# Altium PCB LTE GNSS Tracker.PcbDoc (part 5 of 5)
Units mil, origin at the board's own origin, x right, y up, seen from the top; angles counter-clockwise.
Board outline 2165.35 x 4361.93 mil, 4 copper layers (Top Layer, Layer 1, Layer 2, Bottom Layer), stack 38.189 mil thick; 158 components, 113 nets, 617 pads, 1197 vias.
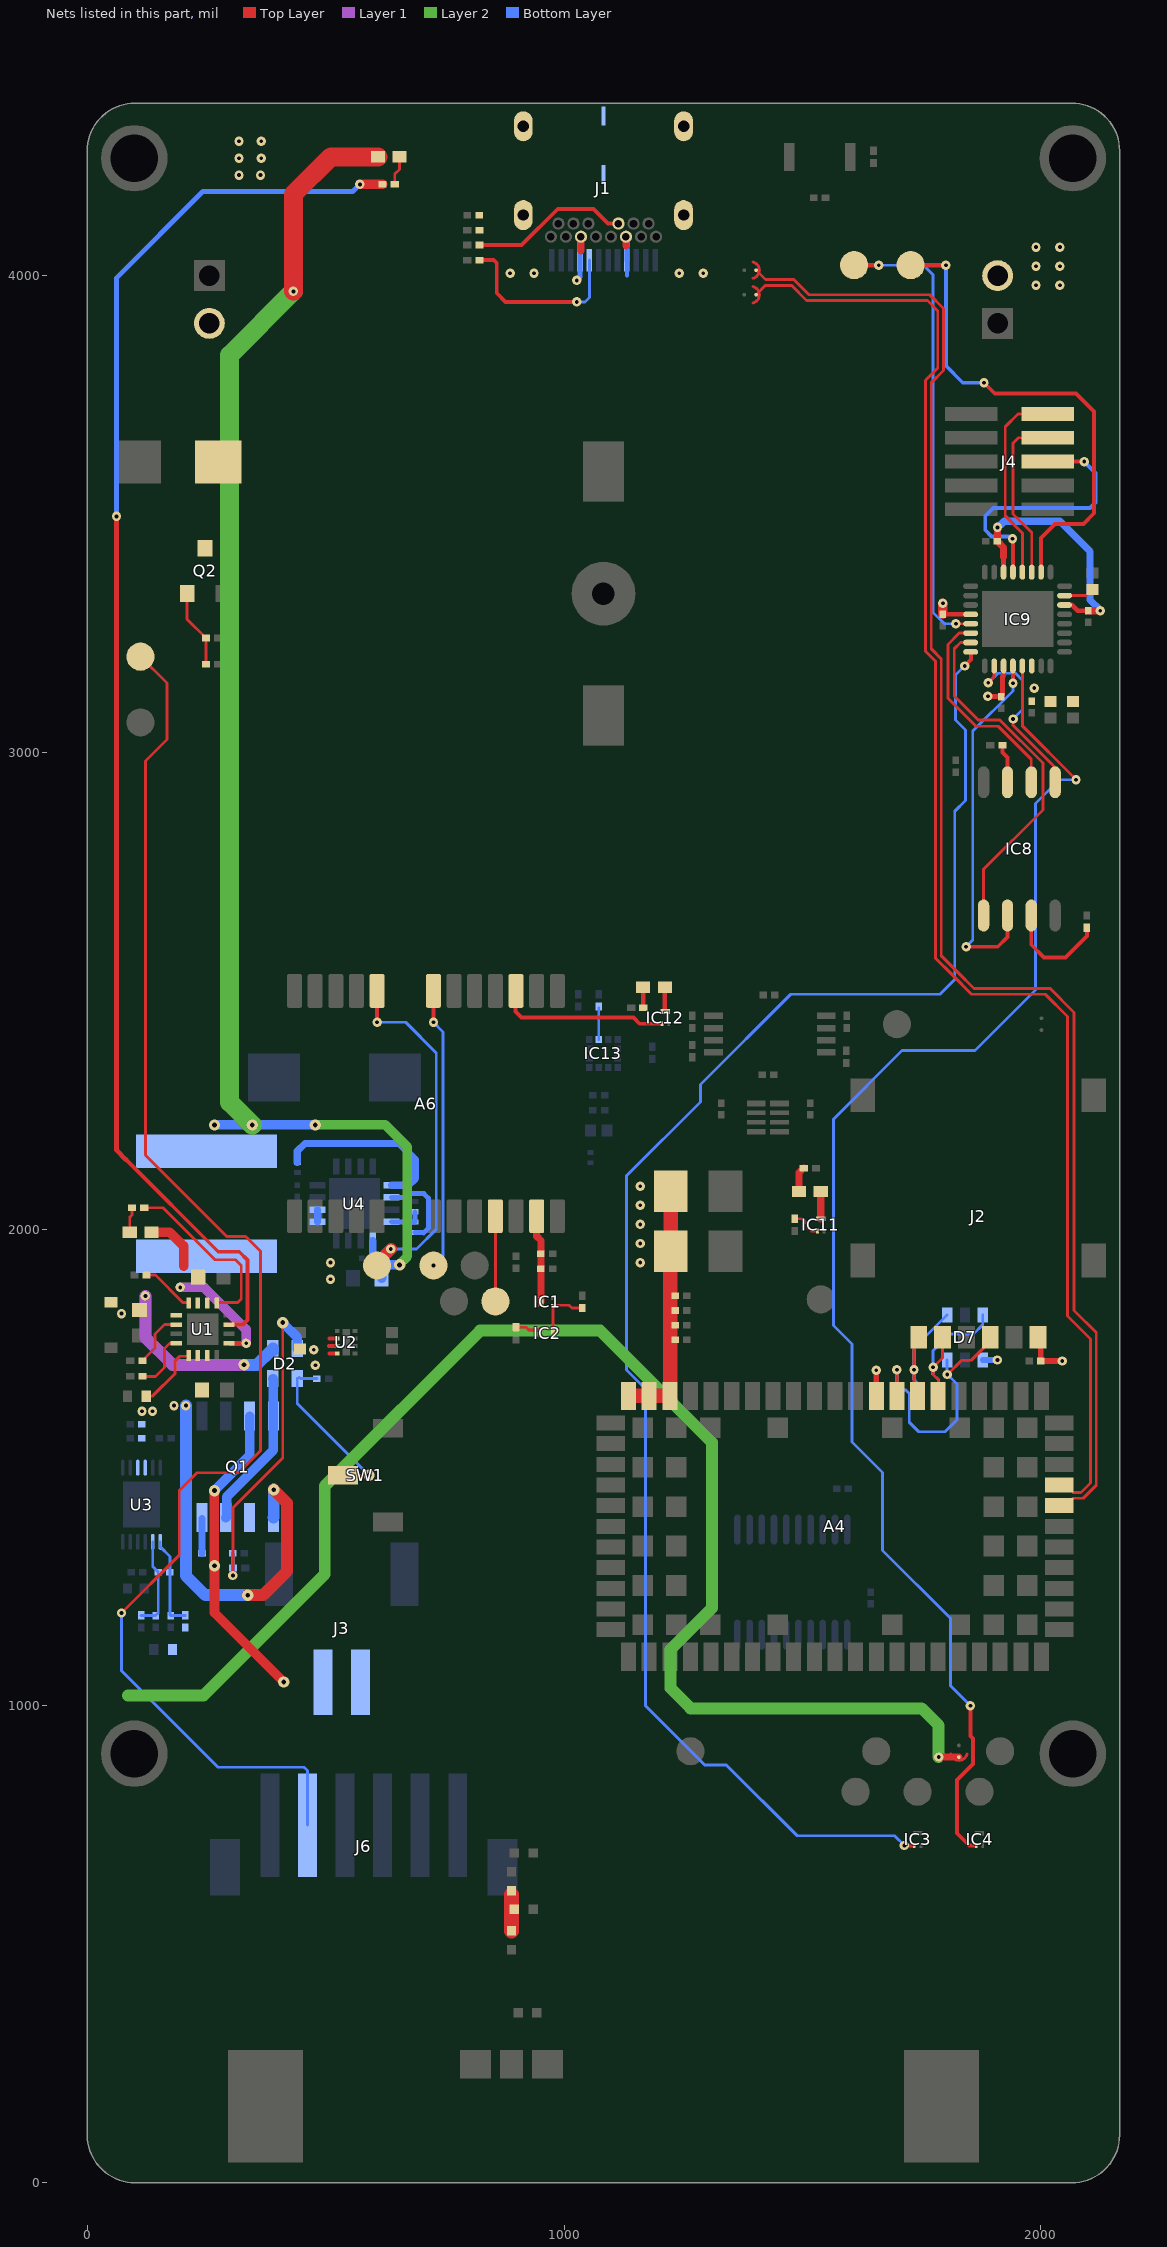
[diagram p5: the nets of this part, all layers, seen from the top]

## Via types
v1: diameter 19.68, hole 7.87, Top Layer to Bottom Layer, 1112 vias
v2: diameter 19.68, hole 7.87, Top Layer to Bottom Layer, tented both sides, 56 vias
v3: diameter 24, hole 10, Top Layer to Bottom Layer, 29 vias

## Nets (pads, with @x,y where several pads share a name; then routed paths per layer and width w, separated by ;. In a path a pad name is that pad's centre, name@x,y a point inside that pad or via, vN(x,y) a via of type N, cw(c..) or ccw(c..) an arc to the next point about the centre after c; other vN are vias at no path point) (continued)
NetA6_7: A6.7 TP14.1 | length 592.7
  Top Layer w6: A6.7@726.01,2499.74 A6.7@726.27,2499.47
  Top Layer w8: v2(726.27,2433.94) A6.7@726.27,2499.47
  Bottom Layer w6: v2(726.01,1923.88) 746.39,1944.26 746.39,2413.83 v2(726.27,2433.94)
NetA6_8: A6.8 TP7.1 | length 745.4
  Top Layer w8: v2(607.9,2433.94) A6.8@607.9,2499.73
  Top Layer w25: TP7.1@607.9,1923.88 607.9,1929.62 v2(636.64,1958.36)
  Bottom Layer w6: v2(607.9,2433.94) 667.96,2433.94 732.07,2369.83 732.07,1999.97 690.45,1958.36 v2(636.64,1958.36)
NetA6_21: A6.21 TP8.1 | length 178.8
  Top Layer w6: TP8.1@855.93,1848.51 A6.21@855.93,2027.29
NetC5_2: C5.2 J1.SH1 J1.SH2 J1.SH3 J1.SH4 R8.1
NetC6_2: C6.2 D2.4 R10.2 | length 688.6
  Top Layer w6: v1(305.43,1273.73) 305.43,1415.56 409.92,1520.05 v3(409.92,1804.05)
  Bottom Layer w6: C6.2@305.14,1320.27 305.34,1320.07 305.34,1289.45 305.49,1289.31 305.49,1273.79 v1(305.43,1273.73)
  Bottom Layer w20: v3@411,1804.05 v3(409.92,1804.05) 409.92,1803.15 440.62,1772.44 440.62,1750.09 D2.4@440.26,1749.73
NetC7_2: C7.2 D2.1 SW1.2 | length 359.6
  Top Layer w6: SW1.2@534.67,1483.8 v3(590.93,1483.8)
  Bottom Layer w6: D2.1@440.26,1686.73 440.26,1634.48 v3(590.93,1483.8) ; D2.1@444.58,1689.14 447.09,1686.63 C7.2@481.53,1686.63
NetC16_2: C16.2 C49.1 R17.1 | length 76.9
  Top Layer w31.5: C49.1@889.76,528.18 889.76,604.76 R17.1@890,605
NetC19_2: C19.2 C21.2 R32.1 U3.7 | length 194.8
  Bottom Layer w6: U3.7@153.12,1344.3 153.12,1333.74 173.31,1313.55 C21.2@173.36,1280.74 173.31,1190.89 C19.2@174.83,1189.39 175.43,1189.95 R32.1@205.5,1189.95
NetC21_1: C21.1 C22.1 R33.1 U3.8 | length 192.6
  Bottom Layer w6: R33.1@112.8,1189.95 113.3,1189.45 143.16,1189.45 148.9,1195.19 148.9,1280.71 137.37,1292.24 U3.8@137.37,1344.3
NetC38_1: C38.1 IC9.23 | length 63.6
  Top Layer w6: IC9.23@2049.82,3328.95 2095.14,3328.95 C38.1@2108.1,3341.91
NetD1_2: D1.2 R5.2 | length 53.5
  Top Layer w6: D1.2@88.98,1993.44 88.98,2025.03 93.96,2030.01 R5.2@93.96,2044.9
NetD2_2: D2.2 Q1.4 Q1.7 Q1.8 R9.1 | length 406.1
  Bottom Layer w15: R9.1@240.37,1320.27 240.57,1320.42 Q1.8@240.57,1392.72
  Bottom Layer w20: Q1.7@290.43,1395.17 292.24,1396.98 292.24,1438.61 390.43,1536.8 Q1.4@390.43,1607.77 389.75,1608.45 389.75,1686.06 D2.2@389.07,1686.73
NetD3_A: D3.A J5.2 J7.2 Q2.3
  other v1: 1990,3980 2040,3980 1990,4020 2040,4020 1990,4060 2040,4060 318.26,4211 363.26,4211 318.26,4246.5 365,4246.5 318.26,4282 365,4282
NetD4_2: D4.2 R2.2 | length 61.9
  Top Layer w6: R2.2@644.89,4191.45 644.89,4213.05 654.65,4222.81 D4.2@654.69,4249.25
NetD8_1: D8.1 R25.2 | length 53.3
  Top Layer w15: D8.1@1493.13,2079.14 1493.13,2118.75 1502.42,2128.04 R25.2@1502.97,2128.04
NetD8_2: D8.2 IC11.D | length 57.3
  Top Layer w15: IC11.D@1538.41,2021.89 D8.2@1538.41,2079.14
NetD9_1: D9.1 R26.2 | length 43.4
  Top Layer w6: R26.2@1166.05,2464.69 R26.2@1166.39,2464.35
  Top Layer w10: R26.2@1166.05,2464.69 D9.1@1166.02,2507.6
NetD9_2: D9.2 IC12.D | length 51.6
  Top Layer w6: IC12.D@1211.32,2457.7 IC12.D@1212.6,2456.54
  Top Layer w10: IC12.D@1211.32,2457.7 D9.2@1211.32,2507.56
NetIC1_G: IC1.G IC2.D R18.1 | length 122.3
  Top Layer w6: IC2.D@977.12,1781.38 IC1.G@977.12,1840.59 1010.6,1840.59 1016.5,1834.68 R18.1@1037.77,1834.68
NetIC2_G: IC2.G R34.2 | length 54.7
  Top Layer w6: R34.2@899.24,1794.18 919.87,1794.18 925.77,1788.27 IC2.G@951.53,1788.27
NetIC3_G: IC3.G IC9.8 | length 3412.2
  Top Layer w6: IC9.8@1852.97,3210.84 1852.97,3209 IC9.8@1853.82,3208.15
  Top Layer w8: v2(1713.89,707.2) IC3.G@1734.6,707.2 ; v2(1840.23,3181.31) 1853.82,3194.9 IC9.8@1853.82,3208.15
  Bottom Layer w6: v2(1713.89,707.2) 1693.3,727.79 1489.01,727.79 1341.02,875.78 1295.45,875.78 1170.99,1000.25 1170.99,1664.67 1131.22,1704.44 1131.22,2112.24 1285.86,2266.87 1285.86,2303.2 1475.46,2492.8 1788.36,2492.8 1819.56,2524 1819.56,2876.68 1841.85,2898.96 1841.85,3047.29 1821.16,3067.98 1821.16,3162.23 v2(1840.23,3181.31)
NetIC4_G: IC4.G IC9.13 | length 3001.7
  Top Layer w6: IC9.13@1961.24,3181.31 1961.24,3056 2073.84,2943.4 v1(2073.84,2942.66)
  Top Layer w8: v2(1852.35,1000.5) 1852.35,936.98 1857.47,931.86 1857.47,878.01 1824.21,844.74 1824.21,732.84 1849.84,707.2 IC4.G@1864.52,707.2
  Bottom Layer w6: v2(1852.35,1000.5) 1810.4,1042.45 1810.4,1183.83 1668.04,1326.19 1668.04,1489.74 1604,1553.78 1604,1759.12 1565,1798.12 1565,2230.58 1709.06,2374.65 1861.77,2374.65 1988.94,2501.82 1988.94,2892.74 2038.86,2942.66 v1(2073.84,2942.66)
NetIC8_3: IC8.3 R23.1 | length 224.9
  Top Layer w8: IC8.3@1980.1,2657.94 1980.09,2596.76 2006.85,2570 2051.85,2570 2096.8,2614.95 R23.1@2096.8,2632.25
NetIC8_7: IC8.7 R22.1 | length 81.8
  Top Layer w8: R22.1@1919.55,3014.9 1919.55,3000.01 1930.09,2989.47 IC8.7@1930.1,2937.47
NetIC9_5: IC9.5 TP12.1 | length 971.2
  Top Layer w6: TP12.1@1608.43,4022.03 TP12.1@1608.43,4022.03 ; v2@1660.25,4021.96 v2(1660.32,4021.89) ; v2@1821.88,3269.86 IC9.5@1852.97,3269.89
  Top Layer w10: TP12.1@1608.43,4022.03 v2@1660.25,4021.96
  Bottom Layer w6: v2(1660.32,4021.89) 1754.2,4021.89 1774,4002.1 1774,3293.6 1797.77,3269.82 v2(1821.85,3269.82)
NetIC9_26: IC9.26 TP13.1 | length 1053.5
  Top Layer w8: v2(1880.85,3775.51) 1903.46,3752.89 2074.02,3752.89 2111.77,3715.14 2111.77,3501.6 2089.6,3479.43 2029.92,3479.43 2000.61,3450.12 IC9.26@2000.61,3378.16
  Top Layer w10: TP13.1@1726.95,4022.03 v2(1800.87,4022.03)
  Bottom Layer w8: v2(1800.87,4022.03) 1800.87,3810.98 1836.34,3775.51 v2(1880.85,3775.51)
NetIC11_G: IC11.G R31.2 | length 62.2
  Top Layer w6: R31.2@1484,2021.89 1499.29,2021.89 1511.14,2010.04 1511.14,2003.07 1517.92,1996.3 IC11.G@1531.52,1996.3
NetIC13_2: IC13.2 R27.1 | length 66.2
  Bottom Layer w6: IC13.2@1072.83,2398.03 1072.83,2464.18 R27.1@1072.9,2464.25
NetJ1_A5: J1.A5 R4.1 | length 386.3
  Top Layer w8: R4.1@822.4,4032.6 852.4,4032.6 859,4026 859,3963 877,3945 v1(1026.85,3945)
  Bottom Layer w6: v1(1026.85,3945) 1044.24,3945 1053.15,3953.91 J1.A5@1053.15,4032.6
NetJ1_B5: J1.B5 R6.1 | length 335.8
  Top Layer w8: R6.1@822.4,4064.33 911.1,4064.25 986.85,4140 1061.86,4140 1092.49,4109.37 J1.B5@1114.17,4109.37
NetL1_2: L1.2 U4.3 U4.4 | length 25.6
  Bottom Layer w15: U4.4@482.62,2015.49 U4.3@482.62,2041.08
NetQ2_1: Q2.1 R13.1 R14.2 | length 172.9
  Top Layer w6: Q2.1@209.45,3341.5 209.45,3279.51 R14.2@249.01,3239.95 249.01,3237.84 249.1,3237.75 R13.1@249.1,3185.05
NetR1_1: R1.1 U1.14 | length 118.2
  Top Layer w6: R1.1@115.8,1724.45 141.85,1750.5 141.85,1780 161.74,1799.89 U1.14@185.47,1799.89
NetR2_1: R2.1 U1.7 | length 3005.5
  Top Layer w8: 81.08,2146.01 274.57,1952.52 318.7,1952.52 336.14,1935.08 336.14,1809.3 326.74,1799.89 U1.7@298.46,1799.89
  Top Layer w10: v1(61.38,3495) 61.38,2165.72 81.08,2146.01
  Top Layer w20: v1(571.85,4191.45) R2.1@619.3,4191.45
  Bottom Layer w10: v1@61.38,3496 61.38,3995.44 242.49,4176.56 556.95,4176.56 v1(571.85,4191.45)
NetR3_2: R3.2 U1.12 | length 111.7
  Top Layer w6: R3.2@124.49,1903.95 142.89,1903.95 200.3,1846.54 U1.12@212.44,1846.54
NetR5_1: R5.1 U1.9 | length 377.8
  Top Layer w6: R5.1@119.55,2044.9 158.81,2044.9 267.78,1935.93 310.68,1935.93 322.85,1923.77 322.85,1853.75 315.64,1846.54 U1.9@271.49,1846.54
NetR7_1: R7.1 U1.16 | length 121.8
  Top Layer w6: R7.1@115.8,1691.24 143,1691.15 161.85,1710 161.85,1750 172.37,1760.52 U1.16@185.47,1760.52
NetR11_1: R11.1 R12.1 U4.9 | length 70.9
  Bottom Layer w10: U4.9@638.13,2015.49 638.44,2015.18 686.83,2015.18 R11.1@687.14,2014.87 R12.1@687.14,2036.54
NetR35_2: R35.2 U4.12 | length 387.5
  Bottom Layer w15: R35.2@440.49,2140.21 440.49,2163.85 456.66,2180.02 654.21,2180.02 687.81,2146.42 687.81,2105.97 673.97,2092.12 638.27,2092.12 U4.12@638.13,2092.26
NetRth_1: Rth.1 U1.1 | length 139
  Top Layer w6: Rth.1@123.8,1649.56 136.4,1649.56 184.34,1697.5 184.34,1724 193.89,1733.55 U1.1@212.44,1733.55
RESET: J6.2 TP2.1 | length 3054.4
  Top Layer w6: v1(71.85,1195) 193,1316.15 193,1452.17 230.07,1489.24 317.03,1489.24 362.96,1535.17 362.96,1953.7 332.18,1984.48 292.62,1984.48 121.85,2155.25 121.85,2981.85 166.85,3026.85 166.85,3145.44 TP2.1@111.53,3200.79
  Bottom Layer w6: v1(71.85,1195) 71.85,1073.74 274.07,871.52 454.82,871.52 461.89,864.45 J6.2@461.89,750
SIM_CLK: A4.38 C48.2 D7.6 J2.C3 | length 369.7
  Top Layer w6: A4.38@1784.8,1650.37 1784.8,1684.39 1774,1695.19 v1(1774,1710.19) 1793.91,1730.1 J2.C3@1793.91,1772.88
  Bottom Layer w6: C48.2@1784.79,1662.55 1784.79,1684.4 1774,1695.19 v1(1774,1710.19) 1774,1745.19 1809,1780.19 1858.99,1780.19 1878.27,1799.47 D7.6@1878.27,1820.11
SIM_IO: A4.39 C47.2 D7.4 J2.C7 | length 319.1
  Top Layer w6: A4.39@1741.49,1650.37 1734,1657.87 v1(1734,1705.19) 1734,1762.97 J2.C7@1743.91,1772.88
  Bottom Layer w6: C47.2@1741.49,1662.55 1741.49,1677.71 1734,1685.2 v1(1734,1705.19) 1734,1750.64 D7.4@1803.47,1820.11
SIM_RST: A4.40 C46.2 D7.3 J2.C2 | length 565.5
  Top Layer w6: A4.40@1698.19,1650.37 v1(1698.18,1705.19) ; v1(1804,1695.19) 1834,1725.19 1854,1725.19 1893.91,1765.1 J2.C2@1893.91,1772.88
  Bottom Layer w6: v1(1698.18,1705.19) 1698.19,1662.55 1716.64,1662.55 1724,1655.19 1724,1595.19 1744,1575.19 1799,1575.19 1824,1600.19 1824,1675.19 v1(1804,1695.19) 1803.47,1695.72 D7.3@1803.47,1725.62
SPI_CLK: IC8.6 IC9.6 | length 446.5
  Top Layer w6: IC9.6@1852.97,3250.21 1829.06,3250.21 1805.23,3226.38 1805.23,3113.62 1863.85,3055 1910.84,3055 1980.09,2985.75 IC8.6@1980.1,2937.47
SPI_CS_FLASH: IC8.1 IC9.7 | length 754.3
  Top Layer w6: IC9.7@1852.97,3230.52 1831.64,3230.52 1818.5,3217.38 1818.5,3118.1 1868.6,3068 1913.85,3068 2004.35,2977.5 2004.35,2879.26 1880.09,2755 IC8.1@1880.1,2657.94
SPI_MISO: IC8.2 IC9.12 | length 769.6
  Top Layer w8: v1(1843.32,2592.57) 1909.64,2592.57 1930.09,2613.02 IC8.2@1930.1,2657.94 ; v1(1941.55,3145) IC9.12@1941.55,3181.31
  Bottom Layer w6: v1(1843.32,2592.57) 1857.18,2606.44 1857.18,3044.72 1941.55,3129.09 v1(1941.55,3145)
SPI_MOSI: IC8.5 IC9.10 | length 385.6
  Top Layer w6: v1(1889.59,3146) 1902.18,3158.59 IC9.10@1902.18,3181.31 ; v1(1941.85,3070) 1941.85,3057 2030.09,2968.76 IC8.5@2030.1,2937.47
  Bottom Layer w6: v1(1889.59,3146) 1909.59,3166 1946.85,3166 1961.85,3151 1961.85,3090 v1(1941.85,3070)
SWCLK: IC9.27 J4.4 | length 363.7
  Top Layer w6: IC9.27@1980.92,3378.16 1980.92,3461.32 1941.85,3500.4 1941.85,3648.4 1953.44,3660 J4.4@2014.3,3660
SWDIO: IC9.28 J4.2 | length 419.9
  Top Layer w6: IC9.28@1961.24,3378.16 1961.24,3460.34 1925.28,3496.3 1925.28,3682.99 1952.29,3710 J4.2@2014.3,3710
SWO: IC9.29 J4.6 | length 579.3
  Top Layer w8: IC9.29@1941.55,3378.16 v2@1941.55,3448.44 ; J4.6@2014.3,3610 v2(2090.9,3610)
  Bottom Layer w8: v2(1940.55,3448.44) 1937.39,3448.44 1932.64,3453.19 1896.81,3453.19 1883.5,3466.5 1883.5,3495.85 1900.22,3512.56 2102.95,3512.56 2114.7,3524.32 2114.7,3586.2 v2(2090.9,3610)
TIMEPULSE: A6.3 IC12.G | length 361.8
  Top Layer w8: A6.3@899.24,2499.74 898.2,2498.7 898.2,2456.36 910.82,2443.74 1145.8,2443.74 1158.6,2430.95 IC12.G@1205.71,2430.95
USB_N: A4.28 SB3.2 | length 3237.2
  Top Layer w6: SB3.2@1403.79,4011.48 1403.79,4010.71 1422.76,3991.74 1481.83,3991.74 1513.57,3960 1766.97,3960 1795.95,3931.02 1795.95,3801.35 1770.1,3775.51 1770.1,3217.31 1791.2,3196.22 1791.2,2573.36 1826.79,2537.76 1859.76,2504.8 1878.55,2504.8 1880.09,2504.8 1971.75,2504.8 2019.9,2504.8 2069.96,2454.74 2069.96,1829.34 2116.2,1783.09 2116.2,1462.84 2089.08,1435.71 2068.17,1435.71 2052.52,1420.06 A4.28@2038.74,1420.06
USB_P: A4.29 SB2.2 | length 3194.2
  Top Layer w6: SB2.2@1403.79,3960 1403.79,3960.77 1422.76,3979.74 1476.86,3979.74 1508.6,3948 1762,3948 1783.95,3926.05 1783.95,3806.32 1758.1,3780.48 1758.1,3212.34 1779.2,3191.25 1779.2,2568.39 1814.07,2533.52 1854.79,2492.8 1878.55,2492.8 1880.09,2492.8 1971.75,2492.8 2009.47,2492.8 2056.01,2446.25 2056.01,1818.03 2104.2,1769.84 2104.2,1467.81 2084.11,1447.71 2068.17,1447.71 2052.52,1463.37 A4.29@2038.74,1463.37
V_GPS: A6.23 C54.2 C55.2 IC1.D | length 183.5
  Top Layer w15: A6.23@942.55,2027.29 942.55,1985 951.53,1976.02 C55.2@951.53,1948.13 C54.2@951.53,1917.05 IC1.D@951.53,1847.48
VBATT: C3.2 C17.2 C18.2 Q1.5 Q1.6 U1.2 U1.3 U3.3 U3.4 | length 848.3
  Top Layer w25: v3(336.79,1232.29) 368.59,1232.29 419.29,1282.98 419.29,1425.44 v3(391.06,1453.67)
  Bottom Layer w25: v1(206.85,1630) 206.85,1273.26 247.82,1232.29 v3(336.79,1232.29) ; Q1.5@390.43,1395.17 391.06,1395.8 v3(391.06,1453.67)
  other v1: 114.85,1618 136.85,1618 181.85,1630
VBATT+: J3.1 Q1.3 R9.2 | length 807
  Top Layer w20: v3@264.8,1294.07 265.87,1295.13 265.87,1451.73 266.33,1451.26 266.33,1294.53 v3(266.8,1294.07) 266.8,1195.56 v3(412.18,1050.19)
  Bottom Layer w10: R9.2@265.96,1320.27 R9.2@266.16,1320.42
  Bottom Layer w20: v3(266.8,1451.73) 340.43,1525.36 Q1.3@340.43,1607.77
VBATT-: J3.2 R16.2 R32.2
VBUS: C1.2 D2.3 D5.1 J1.A4 J1.A9 J1.B4 J1.B9 SB1.1 U1.13 | length 3625.6
  Top Layer w15: 1035.43,4051.42 J1.B9@1035.43,4081.81 ; 1129.92,4061.93 J1.B4@1129.92,4081.81 ; v2(1785.82,893) 1786.19,892.63 1814.2,892.63 SB1.1@1828.11,892.63
  Layer 1 w25: v1(121.85,1860) 121.85,1772.84 179.15,1715.54 v3(328.7,1715.54)
  Layer 2 w25: 84.97,1022 243.84,1022 498.06,1276.22 498.06,1461.33 823.93,1787.21 1075.85,1787.21 1310,1553.06 1310,1205.29 1223.5,1118.8 1223.5,1037.11 1265.62,995 1750,995 1785.82,959.18 v2(1785.82,893)
  Bottom Layer w8: 1131.85,4000 1131.89,4000.04 J1.A9@1131.89,4032.6
  Bottom Layer w10: v1(1026.85,3990) 1033.46,3996.61 J1.A4@1033.46,4032.6
  Bottom Layer w11: J1.A4@1033.46,4032.6 1033.46,4079.84 J1.B9@1035.43,4081.81 ; J1.B4@1129.92,4081.81 1131.89,4079.84 J1.A9@1131.89,4032.6
  Bottom Layer w25: v3(328.7,1715.54) 355.74,1715.54 384.71,1744.51 388.39,1744.51 389.07,1745.2 D2.3@389.07,1749.73
  other v1: 71.85,1823 886.85,4005 936.85,4005 1241.85,4005 1291.85,4005
VMCU: C31.2 C32.2 C33.2 C34.2 C35.2 C36.2 FB1.2 IC9.4 IC9.11 IC9.14 IC9.22 IC9.30 | length 712.8
  Top Layer w10: C32.2@1794.63,3289.76 1794.72,3289.67 1852.88,3289.67 IC9.4@1852.97,3289.58 ; v1(1889.08,3117.76) 1889.59,3117.26 1915.87,3117.26 C36.2@1918.75,3120.13 ; C36.2@1919.85,3120.25 1919.85,3159.01 1921.87,3161.03 IC9.11@1921.87,3181.31 ; IC9.30@1921.87,3378.16 1921.87,3409.67 ; IC9.22@2049.82,3309.26 2064.85,3309.26 2076.98,3297.13 C34.2@2099.85,3297.13
  Top Layer w15: v2(1909.05,3472.03) 1909.05,3442.94 1921.87,3430.12 1921.87,3409.67 ; C34.2@2099.85,3297.13 v1(2124.5,3297.07) v1(2124.5,3297.07)
  Top Layer w20: C32.2@1794.63,3289.76 v1(1794.63,3313.01)
  Bottom Layer w15: v2(1909.05,3472.03) 1910.32,3472.03 1915.75,3477.46 1916.05,3477.46 1923.43,3484.84 2040.38,3484.84 2103.43,3421.8 2103.43,3319.42 2124.5,3298.34 v1(2124.5,3297.07)
  other v1: 1986,3135
VSIM: A4.41 C44.2 C45.2 D7.1 J2.C1 | length 223.5
  Top Layer w12: A4.41@1654.88,1650.37 v1(1654.87,1704.32) ; J2.C1@1993.91,1772.88 1999.76,1767.03 C44.2@1999.76,1723.48 v2(2045.02,1723.48)
  Bottom Layer w8: C45.2@1654.89,1662.55 v1(1654.87,1704.32)
  Bottom Layer w12: D7.1@1878.27,1725.62 v1(1909,1725.62)
VSYS: A4.51 A4.52 A4.53 C2.2 C10.2 C11.2 C12.2 C40.2 C41.2 C42.1 C43.1 C50.2 C51.2 D1.1 D4.1 L1.1 R11.2 U1.5 U1.10 U1.11 U2.6 U2.7 U2.8 U4.8 U4.11 | length 4103.5
  Top Layer w8: 506.93,1754.92 U2.7@524.28,1754.92 ; 507.52,1770.67 U2.6@524.28,1770.67 ; 507.68,1739.17 U2.8@524.28,1739.17
  Top Layer w10: U1.5@298.46,1760.52 298.58,1760.4 v1@333.27,1760.4
  Top Layer w20: D1.1@134.25,1993.44 173.4,1993.44 201.85,1965 201.85,1922
  Top Layer w30: A4.53@1135.19,1650.37 A4.52@1178.5,1650.37 A4.51@1221.81,1650.37 1222.56,1651.12 1222.56,1952.52 C43.1@1223.69,1953.66 C42.1@1223.69,2079.64
  Top Layer w40: v1@432.33,3967.6 432.33,4170.48 511.16,4249.31 D4.1@609.38,4249.31
  Layer 1 w20: v1(194.77,1877.91) 245.06,1877.91 333.27,1789.69 v1(333.27,1760.79)
  Layer 2 w20: v3(477.92,2218.59) 625.3,2218.59 671.32,2172.58 671.32,1942.98 v3@653.33,1925 ; v3@652.92,1924.58 v3@653.33,1925 ; v3(655,1925) v3@653.33,1925
  Layer 2 w40: v3(346.04,2218.59) 298.46,2266.17 298.46,3833.26 v1@432.33,3967.13
  Bottom Layer w10: U4.11@638.13,2066.67 665.27,2066.67 673.22,2074.62 706.08,2074.62 715.51,2065.19 715.51,2001.81 705.88,1992.18 705.16,1992.9 687.46,1992.9 R11.2@687.14,1993.22
  Bottom Layer w15: C11.2@598.76,1939.58 U4.8@598.76,1976.12
  Bottom Layer w20: v3(266.85,2218.59) v3(346.04,2218.59) v3(477.92,2218.59) v3@479.59,2218.59 ; C10.2@617.14,1896.9 C10.2@617.14,1899.4 ; 618.59,1925 v3(655,1925)
  other v1: 478.5,1714.68 475,1747 510,1895 510,1930 432.33,3967
  other v2: 1160,1930 1160,1970 1160,2010 1160,2050 1160,2090
pads on no net: A4.2 A4.31 A4.34 A4.35 A4.36 A4.37 A4.44 A4.45 A4.46 A4.47 A4.48 A4.49 A4.62 A5.0 A6.1 A6.2 A6.4 A6.9 A6.14 A6.15 A6.16 A6.17 IC9.19 IC9.20 IC9.21 IC13.7 IC13.11 J1.A2 J1.A3 J1.A8 J1.A10 J1.A11 J1.B2 J1.B3 J1.B8 J1.B10 J1.B11 J2.C6 J2.SW J3.P1 J3.P2 J4.3 J4.7 J4.8 J6.P1 J6.P2 SW1.1 U2.3 U3.1 U3.12 U4.2 U4.14 U5.3 U5.6
copper on no net: | length 12882.9
  Top Layer w10: 0,100 ccw(c100,100) 100,0 2065.35,0 ccw(c2065.35,100) 2165.35,100 2165.35,4261.93 ccw(c2065.35,4261.93) 2065.35,4361.93 100,4361.93 ccw(c100,4261.93) 0,4261.93 0,100
  other v1: 607.9,2558.95

## Polygon pours and split planes (outlines as drawn)
GND on Top Layer "TOP-GND 2" (solid, remove dead copper, pour order 272): 2145.25,511.06 2145.25,4265.55 2144.94,4272.51 2144.03,4279.42 2142.52,4286.23 2140.43,4292.88 2137.76,4299.32 2134.54,4305.5 2130.8,4311.38 2126.55,4316.91 2121.84,4322.05 2116.7,4326.76 2111.17,4331 2105.3,4334.74 2099.11,4337.96 2092.67,4340.63 2086.03,4342.73 2079.22,4344.23 2072.31,4345.14 2065.35,4345.45 1281.85,4345.45 1281.85,4113.62 1271.85,4103.62 911.85,4103.62 881.85,4133.62 881.85,4345.45 100,4345.45 93.03,4345.14 86.12,4344.23 79.32,4342.73 72.67,4340.63 66.23,4337.96 60.05,4334.74 54.17,4331 48.64,4326.76 43.5,4322.05 38.79,4316.91 34.55,4311.38 30.8,4305.5 27.58,4299.32 24.91,4292.88 22.82,4286.23 21.31,4279.42 20.4,4272.51 20.1,4265.55 20.1,511.06
VSYS on Top Layer "TOP-VSYS" (solid, pour order 144): 256.85,1830 256.85,1880 250.05,1886.79 250.05,1927.48 234.75,1942.78 195.97,1942.78 186.85,1933.66 186.85,1882.32 226.85,1863.63 226.85,1830
NetD3_A on Top Layer "TOP-NETD3_A" (solid, pour order 152): 1860,3960 2090,3960 2090,4130 2070,4150 1860,4150
VSYS on Top Layer "VSYS_L01" (solid, pour order 108): 1250,2120 1130,2120 1110,2100 1110,1930 1130,1910 1250,1910
GND on Top Layer "TOP-GND" (solid, pour order 114): 846.35,511.45 846.35,554.64 302.03,554.64 301.42,553.68 300.64,552.65 299.77,551.69 298.82,550.81 297.79,550.01 296.7,549.31 295.56,548.71 294.36,548.2 293.13,547.81 291.86,547.52 290.58,547.34 289.28,547.28 287.99,547.33 286.7,547.49 285.44,547.77 284.2,548.15 283,548.64 281.84,549.23 280.75,549.92 279.71,550.7 278.75,551.58 277.87,552.53 277.08,553.55 276.37,554.64 191.69,554.64 191.69,511.45 781.7,511.45 781.7,274.97 781.7,219.04 846.35,219.04
NetD3_A on Top Layer "TOP-+5V0 1" (solid, pour order 150): 300,3950 290,3940 220,3940 210,3930 210,3550 180,3520 180,3420 200,3400 360,3400 380,3420 380,4295 300,4295
GND on Top Layer "TOP-GND 1" (solid, pour order 126): 933.09,554.25 1971.98,554.25 1971.98,511.06 998.09,511.06 998.09,219.12 933.09,219.12
+5V0 on Top Layer "TOP-NETD3_A 1" (solid, pour order 268): 50,4030 70,4050 280,4050 290,4040 290,3970 280,3960 210,3960 190,3940 190,3560 170,3540 68.88,3540 50,3561.26
+5V0 on Top Layer "TOP-+5V0" (solid, pour order 148): 2070,3780 1880,3780 1860.7,3799.3 1860.7,3940 2090,3940 2090,3800
VSYS on Top Layer "TOP-VSYS 1" (solid, pour order 146): 406.85,1705 521.85,1705 526.85,1710 526.85,1770 521.85,1775 491.85,1775 476.85,1760 406.85,1760 401.85,1755 401.85,1710 406.85,1705
VBUS on Top Layer "TOP-VBUS 2" (solid, pour order 142): 1140,4085 1140,4065 1150,4055 1285,4055 1305,4035 1305,3995 1285,3975 1246.85,3975 1130,3975 1120,3985 1120,4085
VBUS on Top Layer "TOP-VBUS 1" (solid, pour order 140): 1045,4080 1045,3970 1035,3960 885,3960 875,3970 875,4040 885,4050 1000,4050 1030,4080
VBUS on Top Layer "TOP-VBUS" (solid, pour order 138): 131.85,1815 201.85,1815 201.85,1825 151.85,1875 43.81,1875 34.55,1865.74 34.55,1817.05 41.6,1810 126.85,1810
NetC5_2 on Top Layer "TOP-NETC5_2" (solid, pour order 136): 891.85,4160 891.85,4335 898.77,4341.92 1254.93,4341.92 1271.85,4325 1271.85,4105 1261.85,4095 1241.85,4095 1231.85,4105 1231.85,4280 1201.85,4310 951.85,4310 931.85,4290 931.85,4105 916.85,4090 816.85,4090 816.85,4150 821.85,4155 886.85,4155 891.85,4160
VBATT on Top Layer "TOP-VBATT" (solid, pour order 134): 226.85,1750 256.85,1750 256.85,1645 226.85,1615 186.85,1615 171.85,1630 171.85,1660 226.85,1715 226.85,1750
VMCU on Top Layer "TOP-VMCU" (solid, pour order 132): 1972.85,3190 1986.85,3190 1986.85,3150 2001.85,3135 2076.85,3135 2081.85,3130 2081.85,3100 2076.85,3095 1981.85,3095 1972.85,3104 1972.85,3190
NetA5_S on Top Layer "TOP-NETA5_S" (solid, pour order 130): 913.41,219.12 913.41,498.52 866.16,498.52 866.16,219.12
3V3 on Top Layer "TOP-3V3 1" (solid, pour order 112): 561.85,1705 676.85,1705 681.85,1710 681.85,1755 676.85,1760 561.85,1760 556.85,1755 556.85,1710 561.85,1705
no net on Outlines (none): 0,100 ccw(c100,100) 100,0 2065.35,0 ccw(c2065.35,100) 2165.35,100 2165.35,4261.93 ccw(c2065.35,4261.93) 2065.35,4361.93 100,4361.93 ccw(c100,4261.93) 0,4261.93
VSYS on Bottom Layer "BOTTOM-VSYS" (solid, remove dead copper, pour order 254): 708.27,2009.85 451.85,2009.85 451.85,1970 451.85,1905 451.85,1880 436.85,1865 201.85,1865 201.85,2231.37 74.38,2231.37 74.38,1700.65 527.49,1700.65 708.27,1881.42
VBUS on Bottom Layer "BOTTOM-VBUS" (solid, pour order 252): 51.85,1810 51.85,3465 76.85,3490 76.85,3995 246.85,4165 1291.85,4165 1311.85,4145 1311.85,3975 1286.85,3950 376.85,3950 351.85,3925 351.85,3485 201.85,3335 201.85,2545 146.85,2490 146.85,1810 136.85,1800 61.85,1800 51.85,1810
GND on Bottom Layer "TOP-GND 2" (solid, remove dead copper, pour order 269): 2138.41,246.73 2138.41,4001.22 2138.11,4008.18 2137.2,4015.09 2135.69,4021.9 2133.59,4028.54 2130.93,4034.98 2127.71,4041.17 2123.96,4047.05 2119.72,4052.58 2115.01,4057.71 2109.87,4062.42 2104.34,4066.67 2098.46,4070.41 2092.28,4073.63 2085.84,4076.3 2079.19,4078.39 2072.39,4079.9 2065.47,4080.81 2058.51,4081.12 1275.01,4081.12 1275.01,3849.29 1265.01,3839.29 905.01,3839.29 875.01,3869.29 875.01,4081.12 93.16,4081.12 86.2,4080.81 79.29,4079.9 72.48,4078.39 65.83,4076.3 59.39,4073.63 53.21,4070.41 47.33,4066.67 41.8,4062.42 36.66,4057.71 31.95,4052.58 27.71,4047.05 23.97,4041.17 20.75,4034.98 18.08,4028.54 15.98,4021.9 14.47,4015.09 13.57,4008.18 13.26,4001.22 13.26,246.73
VSYS on Bottom Layer "BOTTOM-+5V0 2" (solid, pour order 276): 156.27,2119.77 396.32,2119.77 396.32,2232.64 156.27,2232.64
NetL1_2 on Bottom Layer "BOTTOM-NETL1_2" (solid, pour order 264): 496.85,2009.85 414,2009.85 414,1909.74 201.85,1909.74 201.85,2042.57 345.17,2042.57 496.85,2042.57
+5V0 on Bottom Layer "BOTTOM-+5V0 2" (solid, pour order 260): 156.85,2247.5 357.76,2247.5 390.35,2280.09 390.35,2350.92 351.47,2389.8 156.85,2389.8
VBATT+ on Bottom Layer "BOTTOM-VBATT+" (solid, pour order 248): 266.85,1260 276.85,1250 276.85,1202.15 302.49,1176.51 453.78,1176.51 511.85,1118.45 511.85,982.89 435.44,982.89 246.85,1171.49 246.85,1290 251.85,1295 261.85,1295 261.85,1265
NetD2_2 on Bottom Layer "BOTTOM-NETD2_1" (solid, pour order 246): 281.85,1380 306.85,1380 316.85,1390 316.85,1440 306.85,1450 281.85,1450 271.85,1440 271.85,1390 281.85,1380
VBATT on Bottom Layer "BOTTOM-VBATT 1" (solid, pour order 242): 216.85,1380 251.85,1380 261.85,1390 261.85,1440 251.85,1450 216.85,1450 206.85,1440 206.85,1390 216.85,1380
+5V0 on Bottom Layer "BOTTOM-+5V0 1" (solid, pour order 258): 2070,3780 1850,3780 1850,3940 2090,3940 2090,3800
+5V0 on Bottom Layer "BOTTOM-+5V0" (solid, pour order 256): 132.85,1056 132.85,1074.7 141.15,1083 169.71,1083 328.8,923.91 753.8,923.91 795.94,881.78 795.94,641.55 757.31,641.55 757.31,858.79 722.12,893.98 294.85,893.99
VBATT- on Bottom Layer "BOTTOM-VBATT-" (solid, pour order 250): 554.07,1118.34 615.6,1118.34 615.6,981.5 572,937.9 335.54,937.9 171.85,1101.59 171.85,1135 196.85,1160 196.85,1175 221.85,1175 231.85,1165 428.18,968.67 541.23,968.67 554.07,981.5
NetD3_A on Bottom Layer "BOTTOM-NETD3_A" (solid, pour order 262): 1850,3960 2089.92,3960 2089.92,4130.92 2070.84,4150 1850,4150
NetC5_2 on Bottom Layer "BOTTOM-NETC5_2" (solid, pour order 244): 906.85,4090 891.85,4105 891.85,4335 898.77,4341.92 1254.93,4341.92 1271.85,4325 1271.85,4105 1261.85,4095 1241.85,4095 1231.85,4105 1231.85,4280 1201.85,4310 1111.85,4310 1096.85,4295 1096.85,4195 1091.85,4190 1076.85,4190 1069.68,4197.17 1069.68,4292.17 1051.85,4310 951.85,4310 931.85,4290 931.85,4105 916.85,4090 906.85,4090
VBATT on Bottom Layer "BOTTOM-VBATT" (solid, pour order 240): 106.85,1485 121.85,1485 123.85,1487 123.85,1593 140.85,1610 216.85,1610 231.85,1625 231.85,1680 221.85,1690 121.85,1690 101.85,1670 101.85,1620 101.85,1535 101.85,1490 106.85,1485
BCVCC on Bottom Layer "BOTTOM-BCVCC" (solid, pour order 224): 141.85,1485 141.85,1530 161.85,1550 161.85,1590 156.85,1595 141.85,1595 133.85,1587 133.85,1485 141.85,1485
3V3 on Bottom Layer "BOTTOM-3V3" (solid, pour order 222): 1021.85,2095 1056.85,2095 1066.85,2105 1066.85,2135 1056.85,2145 1021.85,2145 1011.85,2135 1011.85,2105 1021.85,2095
3V3_ACCEL on Bottom Layer "BOTTOM-3V3_ACCEL" (solid, pour order 220): 1031.85,2345 1081.85,2345 1081.85,2320 1066.85,2305 1066.85,2155 1026.85,2155 1011.85,2170 1011.85,2325 1031.85,2345
+5V0 on Layer 2 "LAYER 2-+5V0" (solid, pour order 273): 281.85,2270 281.85,1743.15 325,1700 470,1700 470,1284.99 230,1045 176.85,1045 110,1045 110,1265 155,1310 335,1310 380,1355 380,1635 345,1670 264.42,1670 234.71,1699.71 165,1700 150,1715 150,1784.42 150,1920 130,1940 10,1940 10,4100 70,4160 1820,4160 1850,4130 1850,3960 1870,3940 2120,3940 2120,3800 1780,3800 1780,3940 501.85,3940 450.3,3991.54 413.16,3991.54 341.85,3920.23 341.85,3485 281.85,3425
VMCU on Layer 2 "LAYER 2-VMCU" (solid, pour order 170): 1780,3500 1780,3045 2005,3045 2005,3500
3V3 on Layer 2 "LAYER 2-3V3" (solid, pour order 164): 1560,1190 1580,1210 1580,1310 1660,1310 1780,1190 1780,1020 1810,990 2140,990 2140,1660 2142.85,1660 2142.85,3770 1780,3770 1780,3520 2020,3520 2020,3030 1780,3030 1780,2525 775,2525 490,2240 490,1610 490,1530 520,1530 810,1820 1090,1820 1340,1570 1340,1190
VBUS on Layer 2 "VBUS_L03" (solid, pour order 275): 10,1930 120,1930 140,1910 140,1710 160,1690 230,1690 260,1660 340,1660 370,1630 370,1360 330,1320 150,1320 95,1265 95,1010 10,1010
VSYS on Layer 2 "VSYS_L03" (solid, pour order 160): 418.04,2260 510,2260 560,2310 1140,2310 1200,2250 1200,1920 1180,1900 1140,1900 1120,1920 1120,2170 1090,2200 560,2200 530,2170 530,1740 500,1710 330,1710 300,1740 300,1850 418.04,1968.04
+5V0 on Layer 2 "BOTTOM-+5V0 2" (solid, pour order 277): 212.77,2040.99 409.92,2040.99 409.92,2153.86 212.77,2153.86
GND on Layer 2 "LAYER 2-GND 1" (solid, pour order 168): 447.99,3925 326.85,3803.86 326.85,2310 356.85,2280 500,2280 765,2544.99 1765,2545 1765,3925
VBATT on Layer 2 "LAYER 2-VBATT" (solid, pour order 271): 210,1650 230,1630 230,1475 264.79,1440.21 264.79,1379.79 245,1360 11,1360 11,1650
NetD3_A on Layer 2 "LAYER 2-NETD3_A" (solid, pour order 274): 290,4315 200,4315 185,4300 185,4190.81 200.81,4175 286.93,4175 1825,4175 1870,4130 1870,3960 2120,3960 2120,4281.85 2086.85,4315
1V8 on Layer 2 "1V8_L03" (solid, pour order 158): 1470,2480 1450,2460 1450,1640 1590,1500 1590,1200 1560,1170 1320,1170 1250,1100 1250,1050 1280,1020 1760,1020 1760,1190 1650,1300 1650,1520 1590,1580 1590,2350 1590,2460 1570,2480
GND on Layer 2 "LAYER 2-GND" (solid, pour order 166): 1290,1220 1200,1130 1200,1020 1250,970 2150,970 2150,511 10,511 10,990 260,990 530,1260 530,1450 840,1760 1060,1760 1290,1530
VSIM on Layer 2 "VSIM_L03" (solid, pour order 162): 1640,1660 1640,1780 1660,1800 2060,1800 2080,1780 2080,1660
GND on Layer 1 "TOP-GND 2" (solid, remove dead copper, pour order 270): 2145.25,511.06 2145.25,4265.55 2144.94,4272.51 2144.03,4279.42 2142.52,4286.23 2140.43,4292.88 2137.76,4299.32 2134.54,4305.5 2130.8,4311.38 2126.55,4316.91 2121.84,4322.05 2116.7,4326.76 2111.17,4331 2105.3,4334.74 2099.11,4337.96 2092.67,4340.63 2086.03,4342.73 2079.22,4344.23 2072.31,4345.14 2065.35,4345.45 1281.85,4345.45 1281.85,4113.62 1271.85,4103.62 911.85,4103.62 881.85,4133.62 881.85,4345.45 100,4345.45 93.03,4345.14 86.12,4344.23 79.32,4342.73 72.67,4340.63 66.23,4337.96 60.05,4334.74 54.17,4331 48.64,4326.76 43.5,4322.05 38.79,4316.91 34.55,4311.38 30.8,4305.5 27.58,4299.32 24.91,4292.88 22.82,4286.23 21.31,4279.42 20.4,4272.51 20.1,4265.55 20.1,511.06

## Keep-outs
Layer 1:
  region: 814.85,1065 964.85,1065 964.85,608.08 964.57,601.54 963.71,595.05 962.3,588.69 962.3,573.22 962.03,566.9 961.2,560.63 959.83,554.45 957.93,548.42 955.51,542.58 952.59,536.97 949.19,531.63 945.34,526.62 941.07,521.95 936.4,517.68 931.39,513.83 926.05,510.43 920.44,507.51 914.6,505.09 908.57,503.19 902.39,501.82 896.12,500.99 889.8,500.72 883.48,500.99 877.21,501.82 871.04,503.19 865.01,505.09 859.16,507.51 853.55,510.43 848.22,513.83 843.2,517.68 838.54,521.95 834.26,526.62 830.41,531.63 827.02,536.97 824.1,542.58 821.67,548.42 819.77,554.45 818.4,560.63 817.58,566.9 817.3,573.22 817.3,589.07 815.92,595.46 815.1,601.96 814.85,608.08
  region: 1082.68,3438.07 1091.83,3437.67 1100.91,3436.48 1109.85,3434.49 1118.59,3431.74 1127.05,3428.23 1135.18,3424 1142.9,3419.08 1150.17,3413.51 1156.92,3407.32 1163.11,3400.56 1168.69,3393.3 1173.61,3385.57 1177.84,3377.45 1181.34,3368.98 1184.1,3360.25 1186.08,3351.3 1187.28,3342.22 1187.68,3333.07 1187.28,3323.92 1186.08,3314.84 1184.1,3305.89 1181.34,3297.16 1177.84,3288.7 1173.61,3280.57 1168.69,3272.84 1163.11,3265.58 1156.92,3258.82 1150.17,3252.64 1142.9,3247.06 1135.18,3242.14 1127.05,3237.91 1118.59,3234.4 1109.85,3231.65 1100.91,3229.67 1091.83,3228.47 1082.68,3228.07 990.08,3228.07 954.59,3226.52 919.38,3221.89 884.71,3214.2 850.84,3203.52 818.03,3189.93 786.53,3173.53 756.57,3154.45 728.4,3132.83 702.21,3108.83 678.22,3082.65 656.6,3054.47 637.52,3024.52 621.12,2993.02 607.53,2960.21 596.85,2926.34 589.16,2891.66 584.52,2856.45 582.98,2820.97 582.98,2499.74 582.58,2490.59 581.38,2481.51 579.4,2472.56 576.64,2463.83 573.14,2455.37 568.91,2447.24 563.99,2439.51 558.41,2432.25 552.22,2425.49 545.47,2419.31 538.2,2413.73 530.48,2408.81 522.35,2404.58 513.89,2401.07 505.15,2398.32 496.21,2396.34 487.13,2395.14 477.98,2394.74 468.82,2395.14 459.74,2396.34 450.8,2398.32 442.06,2401.07 433.6,2404.58 425.48,2408.81 417.75,2413.73 410.48,2419.31 403.73,2425.49 397.54,2432.25 391.96,2439.51 387.04,2447.24 382.81,2455.37 379.31,2463.83 376.55,2472.56 374.57,2481.51 373.38,2490.59 372.98,2499.74 372.98,2820.97 375.32,2874.75 382.35,2928.13 394,2980.69 410.19,3032.03 430.79,3081.77 455.65,3129.52 484.58,3174.92 517.35,3217.63 553.72,3257.33 593.41,3293.7 636.12,3326.47 681.53,3355.39 729.28,3380.25 779.02,3400.85 830.36,3417.04 882.92,3428.7 936.29,3435.72 990.08,3438.07 1082.68,3438.07
  region: 962.57,997.95 962.29,991.63 961.47,985.36 960.1,979.19 958.2,973.16 955.78,967.31 952.85,961.7 949.46,956.37 945.61,951.35 941.33,946.69 936.67,942.41 931.65,938.56 926.32,935.17 920.71,932.25 914.86,929.82 908.83,927.92 902.66,926.55 896.39,925.73 890.07,925.45 883.75,925.73 877.48,926.55 871.3,927.92 865.27,929.82 859.43,932.25 853.82,935.17 848.48,938.56 843.47,942.41 838.8,946.69 834.53,951.35 830.68,956.37 827.28,961.7 824.36,967.31 821.94,973.16 820.04,979.19 818.67,985.36 817.84,991.63 817.57,997.95 817.57,1013.8 816.19,1020.2 815.37,1026.69 815.12,1032.81 815.12,1358.62 815.96,1377.99 818.49,1397.21 822.69,1416.14 828.52,1434.63 835.94,1452.54 844.89,1469.74 855.31,1486.09 867.11,1501.47 880.21,1515.76 894.5,1528.86 909.88,1540.66 926.23,1551.08 943.43,1560.03 961.34,1567.45 979.83,1573.28 998.76,1577.48 1017.98,1580.01 1037.35,1580.85 1084.91,1580.85 1091.44,1580.57 1097.93,1579.71 1104.32,1578.3 1110.56,1576.33 1116.6,1573.83 1122.41,1570.8 1127.93,1567.29 1133.12,1563.31 1137.94,1558.89 1142.36,1554.06 1146.34,1548.87 1149.86,1543.35 1152.88,1537.55 1155.38,1531.5 1157.35,1525.26 1158.77,1518.88 1159.62,1512.39 1159.91,1505.85 1159.62,1499.32 1158.77,1492.83 1157.35,1486.44 1155.38,1480.2 1152.88,1474.16 1149.86,1468.35 1146.34,1462.83 1142.36,1457.64 1137.94,1452.82 1133.12,1448.4 1127.93,1444.42 1122.41,1440.9 1116.6,1437.88 1110.56,1435.38 1104.32,1433.41 1097.93,1431.99 1091.44,1431.14 1084.91,1430.85 1037.35,1430.85 1031.05,1430.58 1024.81,1429.76 1018.65,1428.39 1012.64,1426.5 1006.82,1424.09 1001.23,1421.18 995.92,1417.79 990.92,1413.95 986.27,1409.7 982.02,1405.05 978.18,1400.05 974.79,1394.74 971.89,1389.15 969.47,1383.33 967.58,1377.32 966.22,1371.16 965.39,1364.92 965.12,1358.62 965.12,1032.81 964.83,1026.28 963.98,1019.79 962.57,1013.42 962.57,997.95
Bottom Layer:
  rectangle: 427.27,1352.18 743.16,1658.79

## Other copper
Top Layer:
  rectangle net NetD4_2: 639.32,4184.58 671.95,4261.95
  rectangle net 3V3: 1262.1,2384.78 1334.14,2405.4
  pour cut-out: 862.2,662 917.8,662 917.8,501 862.27,501
Bottom Layer:
  rectangle net VBUS: 370.91,1728.43 405.89,1771.01
  rectangle net +5V0: 348.31,2087.22 470.11,2117.31
  rectangle net VSYS: 591.01,1881.8 640.81,1942.48
  rectangle net GND: 534.61,1877.91 583.8,2007.5
  rectangle net +5V0: 457.85,2082.17 499.11,2152.21
  rectangle net +5V0: 457.85,2112.82 556.08,2152.21
  rectangle net VBATT: 329.06,1364.99 402.49,1424.98
  rectangle net VBATT+: 391.08,977.6 517.9,1124.78
  rectangle net NetD2_2: 229.06,1364.99 302.49,1424.98
  rectangle net VBATT+: 255.09,1280.71 279.35,1328.64
  pour cut-out: 482.5,858.26 519,858.26 519,869.69 482.5,869.69
  pour cut-out: 565.31,863.27 565.31,885.69 553.88,885.69 553.88,863.27

## Silkscreen, mask and mechanical layers (free items; w line width, h text height)
Top Overlay:
  drawing of 31 lines, arcs and shapes, not listed
  text "RESET" at 1470,4300.75 h70
  text "PWR ON" at 550,4285.75 h70
  text "+5V" at 13.82,3985.17 h70
  text "-" at 2092.88,3963.09 h150
  text "+5V" at 2053.73,3883.25 h70
  text "-" at 62.89,3864.36 h150
  text "3V3" at 1477.65,3695.18 h45
  text "SWDIO" at 1576.3,3695.18 h45
  text "CLK" at 1606.17,3644.71 h45
  text "GND" at 1474.18,3592.11 h45
  text "SWO" at 1598.53,3591.67 h45
  text "GND" at 1474.18,3495.48 h45
  text "RST" at 1612.42,3495.48 h45
  text "RST" at 129.36,3245 h60 r90
  text "CTRL" at 134.36,2905 h60 r90
  text "CHARGE" at 166.07,1971.69 h70
  text "PWR ON/OFF" at 491.9,1320.19 h70 r90
  text "PN: 3200901 Rev. A" at 451.96,693.74 h60 r90
Bottom Overlay:
  text "BATTERY" at 684.27,1350.81 h80
  text "-ve" at 553.3,883.16 h80 r270
  text "+ve" at 478.2,872.69 h80 r270
Top Solder:
  region: 462.21,2499.74 462.21,2820.97 cw(c990.08,2820.97) 990.08,3348.83 1082.68,3348.83 cw(c1082.68,3333.07) 1098.44,3333.07 cw(c1082.68,3333.07) 1082.68,3317.31 990.08,3317.31 ccw(c990.08,2820.97) 493.74,2820.97 493.74,2499.74 cw(c477.98,2499.74)
  lines w31.5: 889.76,528.18 889.76,604.76 ; 890,660 890,1348.38 cw(c1048.3,1348.38) 1048.3,1506.68 ; 1050.23,1506.68 1097.79,1506.68
Mechanical 7:
  drawing of 2188 lines, arcs and shapes, not listed
Drill Drawing:
  lines w10: 3952.24,1293.03 4007.49,1293.03 4007.49,1348.28 3952.24,1348.28 3952.24,1293.03
  lines w15: 3902.15,634.17 7127.7,634.17 ; 3902.15,1628.67 7127.7,1628.67 ; 4221.63,509.86 4221.63,1752.98 ; 4540.16,509.86 4540.16,1752.98 ; 5118.14,509.86 5118.14,1752.98 ; 5365.88,509.86 5365.88,1752.98 ; 5726.44,509.86 5726.44,1752.98 ; 6408.85,509.86 6408.85,1752.98 ; 6704.39,509.86 6704.39,1752.98 ; 3902.15,509.86 7127.7,509.86 7127.7,1752.98 3902.15,1752.98 3902.15,509.86
  text "Symbol" at 3976.74,1665.96 h72
  text "Count" at 4258.92,1665.96 h72
  text "Hole Size" at 4577.45,1665.96 h72
  text "Plated" at 5155.43,1665.96 h72
  text "Hole Type" at 5403.17,1665.96 h72
  text "Drill Layer Pair" at 5763.74,1665.96 h72
  text "Via/Pad" at 6446.14,1665.96 h72
  text "Pad Shape" at 6741.68,1665.96 h72
  text "1103" at 4258.92,1541.65 h60
  text "0.200mm (7.87mil)" at 4577.45,1541.65 h60
  text "PTH" at 5155.43,1541.65 h60
  text "Round" at 5403.17,1541.65 h60
  text "Top Layer - Bottom Layer" at 5763.74,1541.65 h60
  text "Via" at 6446.14,1541.65 h60
  text "Rounded" at 6741.68,1541.65 h60
  text "A" at 3951.45,1531.66 h55.25
  text "65" at 4258.92,1417.34 h60
  text "0.200mm (7.87mil)" at 4577.45,1417.34 h60
  text "PTH" at 5155.43,1417.34 h60
  text "Round" at 5403.17,1417.34 h60
  text "Top Layer - Bottom Layer" at 5763.74,1417.34 h60
  text "Via" at 6446.14,1417.34 h60
  text "Rounded" at 6741.68,1417.34 h60
  text "B" at 3951.45,1407.35 h55.25
  text "29" at 4258.92,1293.03 h60
  text "0.254mm (10.00mil)" at 4577.45,1293.03 h60
  text "PTH" at 5155.43,1293.03 h60
  text "Round" at 5403.17,1293.03 h60
  text "Top Layer - Bottom Layer" at 5763.74,1293.03 h60
  text "Via" at 6446.14,1293.03 h60
  text "Rounded" at 6741.68,1293.03 h60
  text "14" at 4258.92,1168.71 h60
  text "0.400mm (15.75mil)" at 4577.45,1168.71 h60
  text "PTH" at 5155.43,1168.71 h60
  text "Round" at 5403.17,1168.71 h60
  text "Top Layer - Bottom Layer" at 5763.74,1168.71 h60
  text "Pad" at 6446.14,1168.71 h60
  text "Rounded" at 6741.68,1168.71 h60
  text "C" at 3951.45,1158.72 h55.25
  text "4" at 4258.92,1044.4 h60
  text "0.600mm (23.62mil)" at 4577.45,1044.4 h60
  text "PTH" at 5155.43,1044.4 h60
  text "Slot" at 5403.17,1044.4 h60
  text "Top Layer - Bottom Layer" at 5763.74,1044.4 h60
  text "Pad" at 6446.14,1044.4 h60
  text "Rounded" at 6741.68,1044.4 h60
  text "G" at 3951.45,1034.41 h55.25
  text "4" at 4258.92,920.09 h60
  text "1.100mm (43.31mil)" at 4577.45,920.09 h60
  text "PTH" at 5155.43,920.09 h60
  text "Round" at 5403.17,920.09 h60
  text "Top Layer - Bottom Layer" at 5763.74,920.09 h60
  text "Pad" at 6446.14,920.09 h60
  text "(Mixed)" at 6741.68,920.09 h60
  text "E" at 3951.45,910.1 h55.25
  text "1" at 4258.92,795.78 h60
  text "1.200mm (47.24mil)" at 4577.45,795.78 h60
  text "PTH" at 5155.43,795.78 h60
  text "Round" at 5403.17,795.78 h60
  text "Top Layer - Bottom Layer" at 5763.74,795.78 h60
  text "Pad" at 6446.14,795.78 h60
  text "Rounded" at 6741.68,795.78 h60
  text "H" at 3951.45,785.79 h55.25
  text "4" at 4258.92,671.46 h60
  text "2.540mm (100.00mil)" at 4577.45,671.46 h60
  text "PTH" at 5155.43,671.46 h60
  text "Round" at 5403.17,671.46 h60
  text "Top Layer - Bottom Layer" at 5763.74,671.46 h60
  text "Pad" at 6446.14,671.46 h60
  text "Rounded" at 6741.68,671.46 h60
  text "F" at 3951.45,661.47 h55.25
  text "1224 Total" at 4258.92,547.15 h60
  text "Slot definitions :" at 3976.74,460.13 h60
  text "Routed Path Length" at 4385.8,460.13 h60
  text "= Calculated from tool start centre position to tool end centre position." at 4892.5,460.13 h60
  text "Hole Length" at 4385.8,410.41 h60
  text "= Routed Path Length + Tool Size = Slot length as defined in the PCB layout" at 4704.42,410.41 h60

## Text inside footprints (layer, text, board x,y; h text height)
J1: Bottom Assembly "PCB Edge" at 1170,4460 h24